# Altium PCB PCB3.PcbDoc
Units mm, origin at the board's own origin, x right, y up, seen from the top; angles counter-clockwise.
Board outline 62.23 x 130.56 mm, 2 copper layers (Top Layer, Bottom Layer); 32 components, 34 nets, 154 pads, 12 vias.
Unrouted connection lines stored in the file: 1.
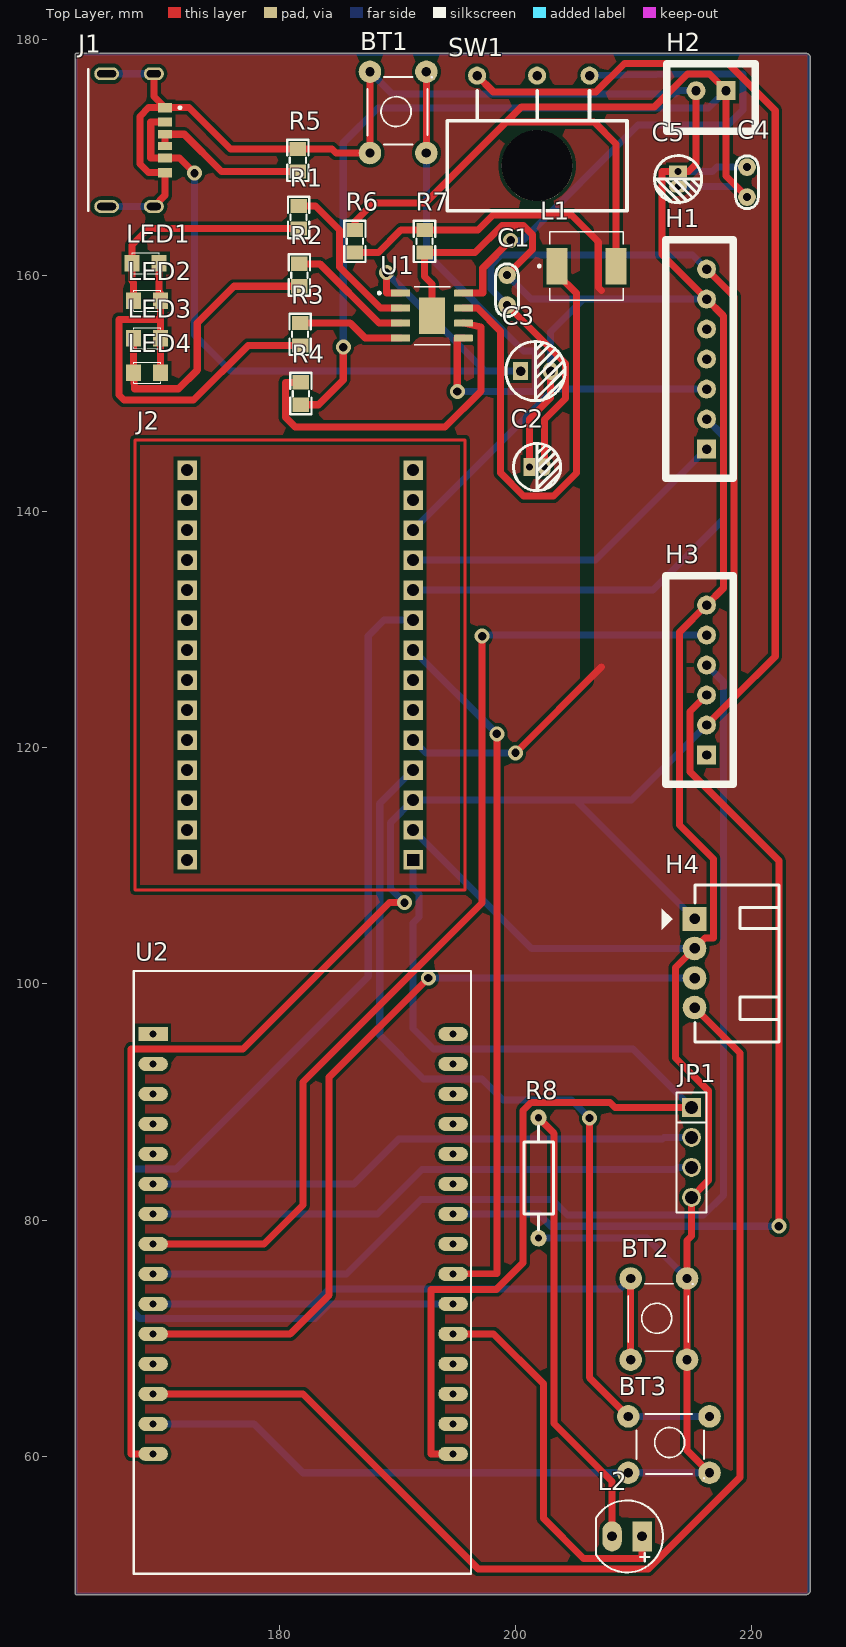
[diagram p0: Top Layer view]
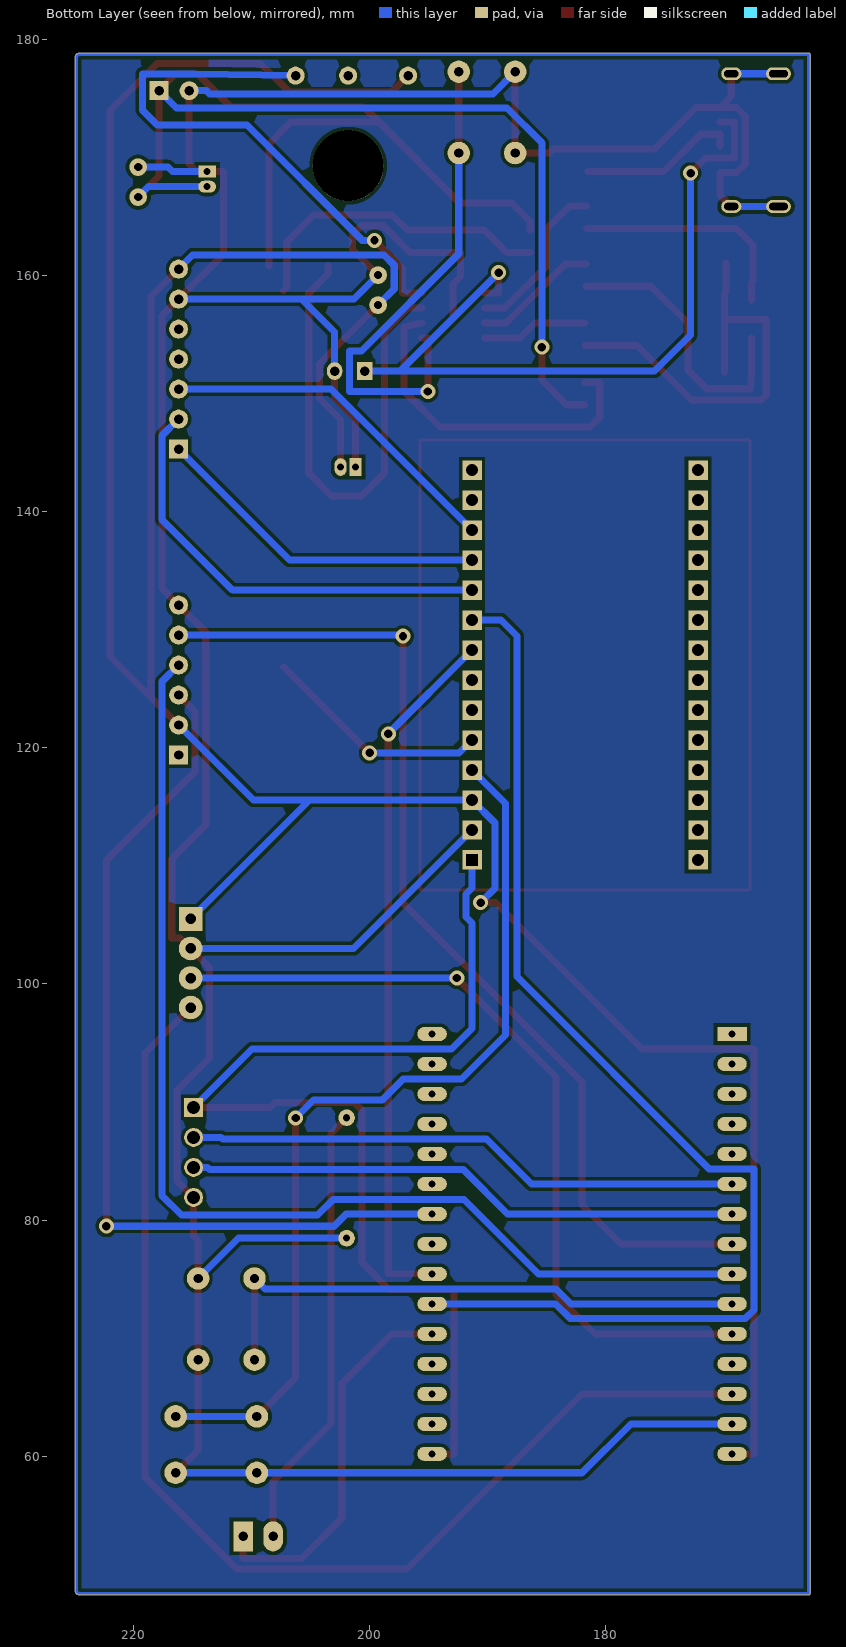
[diagram p1: Bottom Layer view, seen from below]
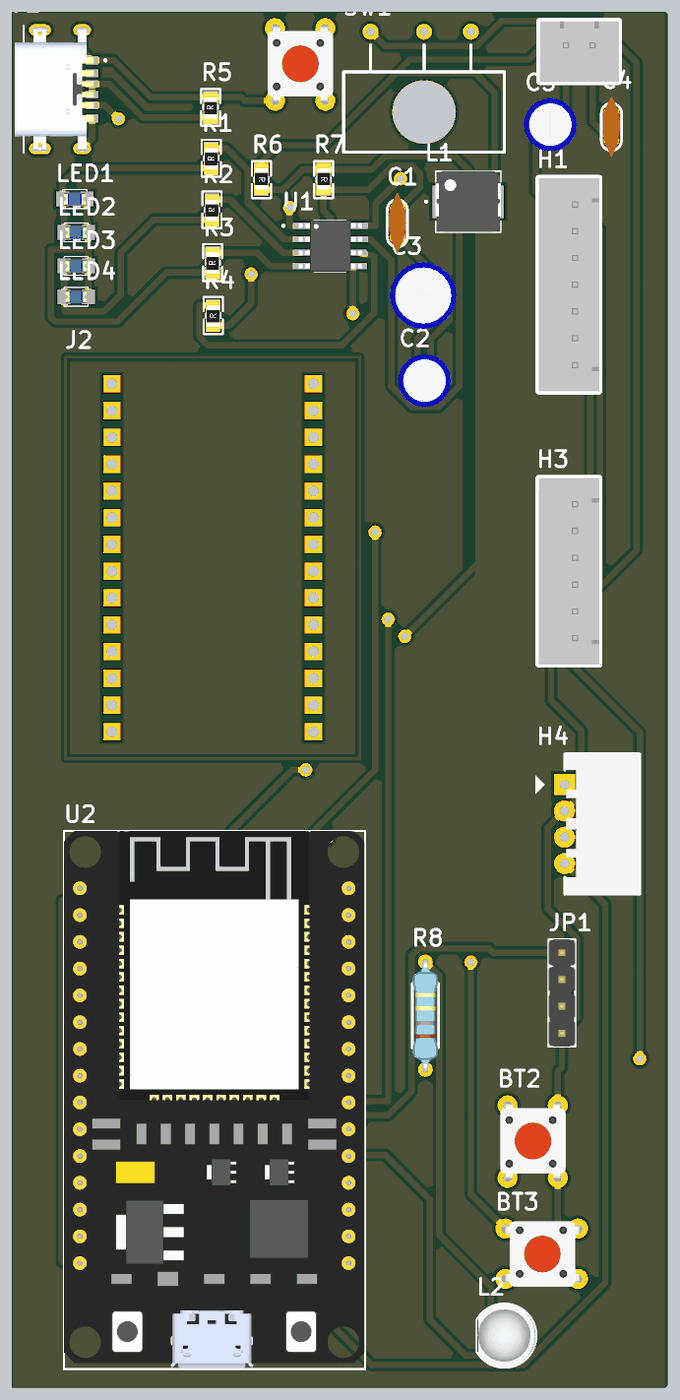
[diagram p2: 3D render of the assembled board from above, using the file's embedded part models]

## Layer stack, top to bottom
Top Solder: solder mask 0.0102, Solder Resist, Dk 3.5
Top Layer: signal copper 0.0356
Dielectric 1: dielectric 0.32, FR-4, Dk 4.8
Bottom Layer: signal copper 0.0356
Bottom Solder: solder mask 0.0102, Solder Resist, Dk 3.5

## Board outline
162.687,48.387 ccw(c162.814,48.387) 162.814,48.26 224.641,48.26 224.731,48.297 224.88,48.446 224.917,48.536 224.917,178.54 224.88,178.63 224.731,178.779 224.641,178.816 162.814,178.816 ccw(c162.814,178.689) 162.687,178.689

## Design rules (kind name [scope] priority, off if disabled: settings)
Clearance [All] p1: gap=0.3 ignorepadtopadclearanceinfootprint=FALSE
PolygonConnect [All] p1: connectstyle=Relief reliefconductorwidth=0.254 reliefentries=4 polygonreliefangle="90 Angle" airgapwidth=0.254
RoutingVias [All] p1: holewidth=0.711 width=1.27 viastyle="Through Hole" minholewidth=0.711 minwidth=1.27 maxholewidth=0.711 maxwidth=1.27
SolderMaskExpansion [All] p1: expansion=0.102 istentingtop=FALSE
SupplyNets "Schematic Supply Nets_2" [InNet('VCC')] p1: voltage=0.000
SupplyNets "Schematic Supply Nets_7" [InNet('BAT_V')] p2: voltage=0.000
SupplyNets "Schematic Supply Nets_6" [InNet('3V3')] p3: voltage=0.000
SupplyNets "Schematic Supply Nets_5" [InNet('VUSB')] p4: voltage=0.000
SupplyNets "Schematic Supply Nets_1" [InNet('GND')] p5: voltage=0.000
Width [All] p1: maxlimit=0.6 minlimit=0.6 preferedwidth=0.6
30 further rules are at their usual default settings.

## Components (designator, comment, footprint, x,y, rotation, side; value= is the part's Value field where it differs from the comment)
BT1 "Button 4P 6x6 DIP" "Nut Nhan 4 Chan Cam 6x6" 187.452,170.688 r90 top
BT2 "SOS" "Nut Nhan 4 Chan Cam 6x6" 209.525,68.504 r90 top
BT3 "SOS" "Nut Nhan 4 Chan Cam 6x6" 209.855,63.576 r0 top
C1 "104" "tu gom" 199.263,158.75 r90 top
C2 "22uF" "tu hoa 4mm" 201.803,143.764 r0 top
C3 "100uF" "tu hoa 5mm" 201.676,151.892 r0 top
C4 "104" "tu gom" 219.583,167.894 r90 top
C5 "22uF" "tu hoa 4mm" 213.741,168.148 r270 top
H1 "DAC MAX98357A" XH2.54M-7 216.16,145.288 r90 top
H2 "Nguồn" XH2.54M-2 217.805,175.641 r180 top
H3 "SIM" XH2.54M-6 216.16,119.38 r90 top
H4 "GPS" "Header 4P DC 2.54" 215.163,105.472 r0 top
J1 "USB4515-GF-A_REVA" GCT_USB4515-GF-A_REVA 165.354,171.45 r270 top
J2 "maixcam" TE_5104338-2 181.737,127 r90 top
JP1 "SR04T" "JP 1x4 DT" 214.884,89.535 r270 top
L1 "150mH" "CUON CAM SMD 0530" 205.994,160.782 r0 top
L2 "LED 5mm" LED-5MM-RED 210.693,53.213 r180 top
LED1 "LED SMD" SM-LED-0805-Blue 167.513,161.036 r0 top
LED2 "LED SMD" SM-LED-0805-Blue 169.926,157.861 r180 top
LED3 "LED SMD" SM-LED-0805-Blue 169.926,154.686 r180 top
LED4 "LED SMD" SM-LED-0805-Blue 167.64,151.765 r0 top
R1 "1K" "tro smd 0805" 181.549,164.903 r90 top value="R1/4W - 1K"
R2 "1K" "tro smd 0805" 181.61,160.02 r90 top value="R1/4W - 1K"
R3 "1K" "tro smd 0805" 181.676,155.002 r90 top value="R1/4W - 1K"
R4 "0R" "tro smd 0805" 181.737,149.987 r90 top value="R1/4W - 1K"
R5 "5K1" "tro smd 0805" 181.483,169.737 r90 top value="R1/4W - 1K"
R6 "100k" "tro smd 0805" 186.436,162.879 r270 top
R7 "100k" "tro smd 0805" 192.339,162.879 r270 top
R8 "330R" "tro vach 1/4w" 201.93,83.566 r270 top
SW1 "SW102B" SW-GAT 196.723,176.911 r0 top value="Switch 102 On Board"
U1 "IP5306" SOP127P600X165-9N 192.913,156.591 r0 top
U2 "ESP32 DEVKIT" "ESP32 WROOM 32 KIT" 169.291,95.758 r0 top

## Footprints (in the part's own frame and the unit in brackets; to place one, negate y for a bottom-side part, rotate by r counter-clockwise, add the part's x,y. Pads: shape width x height; smd on the part's side, far side on the other; paste and mask are expansions set on the pad)
"CUON CAM SMD 0530" [mm] "CUON CAM SMD 0530"
  rect 1.8x3.1 smd: 1(-2.5,0) 2(2.5,0)
  silkscreen extent -4.1,-2.9 3.1,2.9, body extent -3.1,-2.88 3.1,2.92, height 3
"ESP32 WROOM 32 KIT" [mm]
  rect 2.5x1.2 hole 0.6: 1(0,0)
  oval 2.5x1.2 hole 0.6: 2(0,-2.54) 3(0,-5.08) 4(0,-7.62) 5(0,-10.16) 6(0,-12.7) 7(0,-15.24) 8(0,-17.78) 9(0,-20.32) 10(0,-22.86) 11(0,-25.4) 12(0,-27.94) 13(0,-30.48) 14(0,-33.02) 15(0,-35.56) 16(25.4,-35.56) 17(25.4,-33.02) 18(25.4,-30.48) 19(25.4,-27.94) 20(25.4,-25.4) 21(25.4,-22.86) 22(25.4,-20.32) 23(25.4,-17.78) 24(25.4,-15.24) 25(25.4,-12.7) 26(25.4,-10.16) 27(25.4,-7.62) 28(25.4,-5.08) 29(25.4,-2.54) 30(25.4,0)
  silkscreen extent -1.65,-45.72 26.92,5.33, body extent -1.65,-45.6 26.85,5.33, height 10.49
GCT_USB4515-GF-A_REVA [mm]
  rect 0.7x1.2 smd: A5(-0.5,4.95) B5(0.5,4.95)
  rect 0.76x1.2 smd: A9(1.52,4.95) B9(-1.52,4.95)
  rect 0.8x1.2 smd: A12(2.75,4.95) B12(-2.75,4.95)
  oval 1.1x2.1 hole 0.6 slot 1.6 at 90 deg: S1(-5.62,0) S2(5.62,0)
  oval 1.1x1.7 hole 0.6 slot 1.2 at 90 deg: S3(-5.62,4) S4(5.62,4)
  silkscreen extent -6,-1.55 6,6.31, body extent -5.77,-2.4 5.77,5.1, height 1.56
"Header 4P DC 2.54" [mil]
  rect 78.74x78.74 hole 35: 1(-1,1)
  round 78.74 hole 35: 2(-1,-97.43) 3(-1,-195.85) 4(-1,-294.28)
  silkscreen extent -110,-409 280,115, body extent 5,-413 278,123, height 290
"JP 1x4 DT" [mm] "4 pins, 1 row, straight, gold plating"
  rect 1.6x1.6 hole 1.1: 1(0,0)
  round 1.6 hole 1.1: 2(2.54,0) 3(5.08,0) 4(7.62,0)
  silkscreen extent -1.27,-1.27 8.89,1.27, body extent -1.27,-1.27 8.89,1.27, height 8.54
LED-5MM-RED [mil] "LED 2 PIN, 5 ly , Only colour,pin to pin 100mil"
  rect 65x100 hole 32: 1(0,0)
  oval 65x100 hole 32: 2(100,0)
  silkscreen extent -70,-120 154,120, body extent -65,-119 149,118, height 339
"Nut Nhan 4 Chan Cam 6x6" [mil] "SW button 4pin, 250 x250 mil"
  round 75 hole 31: 1(-13,-8) 1(258,-8) 2(-13,-196) 2(258,-196)
  silkscreen extent 15,-215 240,0, body extent -31,-225 281,19, height 276
SM-LED-0805-Blue [mil]
  rect 50x55 smd: 1(0,0) 2(90,0)
  silkscreen extent 0,-35 90,35, body extent 5,-25 85,25, height 43
SOP127P600X165-9N [mm]
  rrect25% 1.61x0.59 smd: 1(-2.655,1.905) 2(-2.655,0.635) 3(-2.655,-0.635) 4(-2.655,-1.905) 5(2.655,-1.905) 6(2.655,-0.635) 7(2.655,0.635) 8(2.655,1.905)
  rect 2.21x3.1 smd paste-3: 9(0,0)
  silkscreen extent -4.56,-2.45 1.53,2.45, body extent -3,-2.45 3,2.45, height 1.65
SW-GAT [mm]
  round 6 hole 6: 0(5.08,-7.62)
  round 1.524 hole 0.8: 1(0,0) 2(5.08,0) 3(9.525,0)
  silkscreen extent -2.54,-11.43 12.7,-1.27
TE_5104338-2 [mm]
  rect 1.651x1.651 hole 1 square: 1(-16.51,-9.57)
  rect 1.651x1.651 hole 1: 2(-13.97,-9.57) 3(-11.43,-9.57) 4(-8.89,-9.57) 5(-6.35,-9.57) 6(-3.81,-9.57) 7(-1.27,-9.57) 8(1.27,-9.57) 9(3.81,-9.57) 10(6.35,-9.57) 11(8.89,-9.57) 12(11.43,-9.57) 13(13.97,-9.57) 14(16.51,-9.57) 15(16.51,9.57) 16(13.97,9.57) 17(11.43,9.57) 18(8.89,9.57) 19(6.35,9.57) 20(3.81,9.57) 21(1.27,9.57) 22(-1.27,9.57) 23(-3.81,9.57) 24(-6.35,9.57) 25(-8.89,9.57) 26(-11.43,9.57) 27(-13.97,9.57) 28(-16.51,9.57)
  Top Layer lines w0.254: -19.05,13.97 19.05,13.97 19.05,-13.97 -19.05,-13.97 -19.05,13.97
"tro smd 0805" [mm]
  rect 1.2x1.4 smd: 1(-0.946,-0.061) 2(0.954,-0.061)
  silkscreen extent -1.75,-0.97 1.75,0.84, body extent -1.56,-0.76 1.44,0.64, height 0.53
"tro vach 1/4w" [mm]
  round 1.4 hole 0.6: 1(-5.1,0) 2(5.1,0)
  silkscreen extent -4.39,-1.25 4.42,1.25, body extent -5.38,-1.2 5.38,1.2, height 2.41
"tu gom" [mm] "Tu gom mini"
  round 1.5 hole 0.7: 1(-1.27,0) 2(1.27,0)
  silkscreen extent -2.25,-0.97 2.22,0.97, body extent -2.92,-0.85 2.92,0.85, height 6.12
"tu hoa 4mm" [mm]
  rect 1x1.5 hole 0.6: 1(-0.635,0)
  oval 1x1.5 hole 0.6: 2(0.635,0)
  silkscreen extent -2,-2 2.01,2.01, body extent -2.47,-2.47 2.58,2.58, height 14.81
"tu hoa 5mm" [mm]
  rect 1.3x1.5 hole 0.8: 1(-1.27,0)
  oval 1.3x1.5 hole 0.8: 2(1.27,0)
  silkscreen extent -2.51,-2.51 2.51,2.51, body extent -3.12,-3.18 3.23,3.18, height 14.55
XH2.54M-2 [mm]
  rect 1.6x1.6 hole 0.8: 1(0,0)
  round 1.6 hole 0.8: 2(2.54,0)
  silkscreen extent -2.48,-2.26 5.02,3.46, body extent -2.48,-2.26 5.02,3.48, height 6.91
XH2.54M-6 [mm]
  rect 1.6x1.6 hole 0.8: 1(0,0)
  round 1.6 hole 0.8: 2(2.54,0) 3(5.08,0) 4(7.62,0) 5(10.16,0) 6(12.7,0)
  silkscreen extent -2.48,-2.26 15.18,3.46, body extent -2.48,-2.26 15.18,3.48, height 6.91
XH2.54M-7 [mm]
  rect 1.6x1.6 hole 0.8: 1(0,0)
  round 1.6 hole 0.8: 2(2.54,0) 3(5.08,0) 4(7.62,0) 5(10.16,0) 6(12.7,0) 7(15.24,0)
  silkscreen extent -2.48,-2.26 17.72,3.46, body extent -2.48,-2.26 17.72,3.48, height 6.91

## Part data
BT1: "Button 4pin 6x6 DIP", Ma_Hang=MH004584, Ten="Nút Nhấn 4 Chân 6x6x5MM DIP"
BT2 BT3: library part "Nut Nhan 4 Chan Cam 6x6", "Nut Nhan 4 Chan 6x6mm", Ma_Hang=MH004584, Ten="Nút Nh?n 4 Chân 6x6x5MM DIP"
C1: library part "Tu gom 104 50V", "C?m", Chung_Loai=C?m, Don_Vi=Con, Ma_Hang=MH004761, So_Chan=2, Ten_Linh_Kien="T? g?m 104 100nF 50V"
C2: library part "Tu Hoa 22uF 16V 4x7", "C?m", Chung_Loai=C?m, Don_Vi=Con, Ma_Hang=MH006857, So_Chan=2, Ten_Linh_Kien="T? Hóa 22uF 16V"
C3: library part "Tu Hoa 100uF 16V 5x11", "Cắm", Chung_Loai=Cắm, Don_Vi=Con, Ma_Hang=MH008417, So_Chan=2, Ten_Linh_Kien="Tụ Hóa 100uF 16V 5x11MM"
C4: library part "Tu gom 104 50V", "Cắm", Chung_Loai=Cắm, Don_Vi=Con, Ma_Hang=MH004761, So_Chan=2, Ten_Linh_Kien="Tụ gốm 104 100nF 50V"
C5: library part "Tu Hoa 22uF 16V 4x7", "Cắm", Chung_Loai=Cắm, Don_Vi=Con, Ma_Hang=MH006857, So_Chan=2, Ten_Linh_Kien="Tụ Hóa 22uF 16V"
H1: library part "Header 7P 2.54 Duc Thang", "C?m", Chung_Loai=C?m, Don_Vi=Con, Ma_Hang=MH003369, Ten_Linh_Kien="Header 7P XH2.54-7P Ð?c Th?ng"
H2: library part "Header 2P 2.54 Duc Thang", "C?m", Chung_Loai=C?m, Don_Vi=Con, Ma_Hang=MH001283, Ten_Linh_Kien="Header 2P XH2.54-2P Ð?c Th?ng"
H3: library part "Header 6P 2.54 Duc Thang", "C?m", Chung_Loai=C?m, Don_Vi=Con, Ma_Hang=MH001972, Ten_Linh_Kien="Header 6P XH2.54-6P Ð?c Th?ng"
H4: library part "Header 4P 2.54 Duc Cong", "C?m", Chung_Loai=C?m, Don_Vi=Con, Ma_Hang=MH001310, Ten_Linh_Kien="Header 4P XH2.54-4P Ð?c Cong"
J1: "Type C USB Charging Connector", Package=None, Check_prices=https://www.snapeda.com/parts/USB4515-GF-A/Global+Connector+Technology/view-part/?ref=eda, Digi-Key_Part_Number=2073-USB4515-GF-ATR-ND, MF="Global Connector Technology", MP=USB4515-GF-A, SnapEDA_Link=https://www.snapeda.com/parts/USB4515-GF-A/Global+Connector+Technology/view-part/?ref=snap
J2: library part 5104338-2, "HEADER, PIN, AMP-LATCH, 14 POS, 2.54 X 2.54, VERTICAL, LOW PROFILE, PCB", Package=None, Check_prices=https://www.snapeda.com/parts/5104338-2/TE+Connectivity+AMP+Connectors/view-part/?ref=eda, EU_RoHS_Compliance=Compliant, MF="TE Connectivity", MP=5104338-2, SnapEDA_Link=https://www.snapeda.com/parts/5104338-2/TE+Connectivity+AMP+Connectors/view-part/?ref=snap
JP1: library part "JP 1x4 2.54 Duc Thang", "C?m", Chung_Loai=C?m, Don_Vi=Con, Ma_Hang=MH000903, Ten_Linh_Kien="Jump Ðon Ð?c 2.54MM 1x40P Th?ng 11MM"
L1: library part "Cuon Cam SMD 0530", "SMD 0530", Package=None, Availability=Unavailable, MP=FDV0530-H-1R5M=P3, Price=None
L2: library part "LED 5mm Do", "C?m", Chung_Loai=C?m, Don_Vi=Con, Ma_Hang=MH008967, Ten_Linh_Kien="Led 5MM Ph? Ð? (1000c)"
LED1 LED2 LED3 LED4: library part LED-SMD-0805
R1 R2 R3 R4 R5: library part R1/4W, "Resistor 1/4W"
R6 R7: library part "Tro 0805 5% 100k", "Dán", Chung_Loai=Dán, Don_Vi=Con, Ma_Hang=MH005250, So_Chan=2, Ten_Linh_Kien="Tr? 0805 5% 100k"
R8: library part "Tro Vach 1/4W 5% 330R", "C?m", Chung_Loai=C?m, Don_Vi=Con, Ma_Hang=MH007436, So_Chan=2, Ten_Linh_Kien="Tr? V?ch 1/4W 5% 330R"
SW1: "Switch 102 on Broad"
U1: "Fully-Integrated Power Bank System-On-Chip with 2.1A charger, 2.4A discharger", Package="SOIC-4 INJOINIC", Check_prices=https://www.snapeda.com/parts/IP5306/Injoinic/view-part/?ref=eda, MF=Injoinic, MP=IP5306, SnapEDA_Link=https://www.snapeda.com/parts/IP5306/Injoinic/view-part/?ref=snap
U2: library part "ESP32 WROOM 32 KIT"

## Via types
v1: diameter 1.27, hole 0.711, Top Layer to Bottom Layer, 12 vias

## Nets (pads, with @x,y where several pads share a name; then routed paths per layer and width w, separated by ;. In a path a pad name is that pad's centre, name@x,y a point inside that pad or via, vN(x,y) a via of type N, cw(c..) or ccw(c..) an arc to the next point about the centre after c; other vN are vias at no path point)
3V3: J2.1 JP1.1 U2.16 | length 93.2
  Top Layer w0.6: U2.16 192.837,60.198 192.837,74.117 198.348,74.117 200.609,76.379 200.609,89.281 201.295,89.967 207.975,89.967 208.407,89.535 JP1.1
  Bottom Layer w0.6: J2.1 191.307,108.118 191.811,107.614 191.811,105.648 191.307,105.144 191.307,96.221 193.04,94.488 209.931,94.488 JP1.1
BAT_ADC: J2.5 R6.2 R7.1 | length 46.5
  Top Layer w0.6: R6.2 188.366,161.925 190.266,163.825 R7.1 196.799,163.825 198.076,165.101 204.718,165.101 206.994,162.825 206.994,158.983 207.264,158.713 ; v1(199.974,119.558) 207.264,126.848
  Bottom Layer w0.6: J2.5 192.399,119.558 v1(199.974,119.558)
BAT_V: C4.1 C5.2 H2.1 L1.2 R4.1 R6.1 | length 133.1
  Top Layer w0.6: R4.1 183.306,149.041 185.395,151.13 v1(185.395,153.924) ; R6.1 186.375,164.557 187.96,166.141 192.354,166.141 199.212,172.999 ; L1.2 208.494,171.134 206.629,172.999 199.212,172.999 ; C4.1 217.805,168.402 H2.1 216.405,177.041 214.531,177.041 211.76,174.269 200.482,174.269 199.212,172.999
  Bottom Layer w0.6: v1(185.395,153.924) 185.395,171.221 188.341,174.168 216.332,174.168 H2.1 ; C5.2 218.694,167.513 C4.1
BTN_3: U2.19
BTN_SCAN: BT3.1 J2.4 | length 77.8
  Top Layer w0.6: v1(206.248,88.646) 206.248,66.65 BT3.1@209.525,63.373
  Bottom Layer w0.6: J2.4 188.479,115.282 188.479,95.671 192.202,91.948 197.129,91.948 198.907,90.17 204.724,90.17 v1(206.248,88.646) ; BT3.1@209.525,63.373 BT3.1@216.408,63.373
BTN_SOS: BT2.1 U2.10 | length 48.2
  Top Layer w0.6: BT2.1@209.728,68.174 BT2.1@209.728,75.057
  Bottom Layer w0.6: U2.10 182.931,72.898 184.201,74.168 208.839,74.168 BT2.1@209.728,75.057
GND: BT1.1 BT2.2 BT3.2 C1.2 C2.1 C3.2 C4.2 C5.1 H1.6 H2.2 H3.6 H4.2 J1.A12 J1.B12 J1.S1 J1.S2 J1.S3 J1.S4 J2.2 JP1.4 R5.2 R7.2 R8.2 U1.9 U2.14 | length 357.6
  Top Layer w0.6: J1.S4 170.304,166.78 J1.A12 168.91,168.7 168.173,169.437 168.173,173.463 168.91,174.2 J1.B12 ; J1.S3 169.354,175.15 J1.B12 ; BT1.1@187.655,177.241 187.655,170.358 184.763,170.358 184.429,170.692 R5.2 175.847,170.692 172.339,174.2 J1.B12 ; U1.9 192.913,159.258 192.278,159.893 R7.2 196.547,161.925 198.823,164.201 200.66,164.201 201.422,163.439 201.422,162.179 C1.2 ; C2.1 201.168,147.828 202.946,149.606 C3.2 ; H2.2 215.265,169.418 214.63,168.783 C5.1 212.369,168.783 212.369,161.778 H1.6 217.576,156.571 217.576,133.497 H3.6 213.86,129.78 213.86,113.445 216.738,110.566 216.738,103.886 216.027,103.886 H4.2 213.538,101.397 213.538,93.726 216.306,90.957 216.306,83.337 JP1.4 214.884,78.664 214.503,78.283 214.503,75.057 214.503,68.174 214.503,60.503 BT3.2@216.408,58.598
  Bottom Layer w0.6: J1.S2 J1.S4 ; J1.S1 J1.S3 ; U2.14 177.851,62.738 181.991,58.598 209.525,58.598 BT3.2@216.408,58.598 ; BT1.1@187.655,177.241 189.535,175.362 213.538,175.362 213.817,175.641 H2.2 ; J2.2 201.34,102.997 H4.2 ; C1.2 201.295,157.988 205.74,157.988 ; R8.2 211.094,78.466 BT2.2@214.503,75.057 ; C3.2 202.946,155.194 205.74,157.988 ; C5.1 216.662,168.783 217.043,169.164 C4.2 ; H1.6 205.74,157.988
GPS_RX: H4.4 U2.13 | length 100.5
  Top Layer w0.6: U2.13 181.991,65.278 196.826,50.443 211.225,50.443 218.999,58.217 218.999,94.136 H4.4
GPS_TX: H4.3 U2.11 | length 69.1
  Top Layer w0.6: U2.11 180.899,70.358 184.201,73.66 184.201,92.1 v1(192.597,100.497)
  Bottom Layer w0.6: v1(192.597,100.497) H4.3
I2S_BCLK: H1.2 J2.10 | length 37.8
  Bottom Layer w0.6: J2.10 211.607,133.35 217.576,139.319 217.576,146.411 H1.2
I2S_DIN: H1.3 J2.12 | length 29.8
  Bottom Layer w0.6: J2.12 203.245,150.368 H1.3
I2S_LRCLK: H1.1 J2.11 | length 28.7
  Bottom Layer w0.6: J2.11 206.762,135.89 H1.1
LED_SOS: L2.1 U2.20 | length 32.4
  Top Layer w0.6: U2.20 198.12,70.358 202.336,66.142 202.336,54.747 205.74,51.343 210.693,51.343 L2.1
LINK_RX: J2.8 U2.22 | length 59.5
  Top Layer w0.6: U2.22 198.399,75.463 v1(198.399,121.178)
  Bottom Layer w0.6: J2.8 v1(198.399,121.178)
LINK_TX: J2.9 U2.21 | length 100
  Bottom Layer w0.6: J2.9 188.849,130.81 187.506,129.467 187.506,100.611 171.223,84.328 167.437,84.328 167.437,72.39 168.148,71.679 183.007,71.679 184.226,72.898 U2.21
NetBT1_2: BT1.2 U1.5 | length 43.2
  Top Layer w0.6: BT1.2@192.43,170.358 BT1.2@192.43,177.241 ; v1(195.047,150.165) 195.047,154.686 U1.5
  Bottom Layer w0.6: BT1.2@192.43,170.358 192.43,161.823 200.66,153.594 201.676,153.594 201.676,150.165 v1(195.047,150.165)
NetJ1_A5: J1.A5 J1.B5 R5.1 | length 13.5
  Top Layer w0.6: J1.B5 J1.A5 171.933,171.95 175.091,168.792 R5.1
NetL1_1: L1.1 U1.7 | length 42.2
  Top Layer w0.6: U1.7 196.748,157.226 198.704,155.27 198.704,143.281 200.66,141.326 203.2,141.326 205.13,143.256 205.13,158.485 203.494,160.122 L1.1
NetL2_2: L2.2 R8.1 | length 38
  Top Layer w0.6: R8.1 203.251,87.345 203.251,62.763 208.153,57.861 L2.2
NetLED1_1: LED1.1 LED2.2 R1.1 | length 19.4
  Top Layer w0.6: LED2.2 167.64,159.385 167.513,159.512 LED1.1 167.513,162.56 168.91,163.957 R1.1
NetLED1_2: LED1.2 LED2.1 LED3.1 LED4.2 R3.1 | length 36.7
  Top Layer w0.6: LED1.2 169.799,158.633 169.926,158.506 LED2.1 169.926,156.261 ; LED4.2 LED3.1 169.926,156.261 ; R3.1 177.348,154.056 172.72,149.428 166.827,149.428 166.395,149.86 166.395,156.261 169.926,156.261
NetLED3_2: LED3.2 LED4.1 R2.1 | length 24.2
  Top Layer w0.6: LED3.2 LED4.1 167.716,150.393 171.45,150.393 173.025,151.968 173.025,155.95 176.149,159.074 R2.1
NetR1_2: R1.2 U1.2 | length 14.1
  Top Layer w0.6: R1.2 183.037,165.857 185.064,163.83 185.064,160.706 188.544,157.226 U1.2
NetR2_2: R2.2 U1.3 | length 10.7
  Top Layer w0.6: R2.2 183.399,160.974 188.417,155.956 U1.3
NetR3_2: R3.2 U1.4 | length 9
  Top Layer w0.6: R3.2 185.979,155.956 187.249,154.686 U1.4
NetR4_2: R4.2 U1.6 | length 29.4
  Top Layer w0.6: R4.2 180.492,150.941 180.492,147.98 181.331,147.142 194.005,147.142 197.053,150.19 197.053,155.626 U1.6
NetSW1_3: SW1.3 U1.8 | length 47.4
  Top Layer w0.6: U1.8 197.206,158.496 197.206,160.604 v1(199.568,162.966)
  Bottom Layer w0.6: v1(199.568,162.966) 200.609,162.966 210.363,172.72 217.957,172.72 219.227,173.99 219.227,177.063 214.808,177.063 SW1.3
RST_SIM: H3.3 U2.24 | length 76.7
  Top Layer w0.6: H3.3 214.76,123.06 214.76,117.958 222.275,110.442 v1(222.275,79.477)
  Bottom Layer w0.6: U2.24 201.955,80.518 202.997,79.477 v1(222.275,79.477)
RX_SIM: H3.4 U2.9 | length 97.6
  Bottom Layer w0.6: U2.9 185.674,75.438 191.973,81.737 203.059,81.737 204.38,80.416 215.9,80.416 217.576,82.093 217.576,125.583 H3.4
SR04_ECHO: JP1.3 U2.7 | length 47.2
  Bottom Layer w0.6: U2.7 188.29,80.518 192.049,84.277 213.538,84.277 213.716,84.455 JP1.3
SR04_TRIG: JP1.2 U2.6 | length 47.2
  Bottom Layer w0.6: U2.6 186.284,83.058 190.094,86.868 212.42,86.868 212.547,86.995 JP1.2
TX_SIM: H3.5 U2.8 | length 87.6
  Top Layer w0.6: U2.8 178.689,77.978 181.991,81.28 181.991,91.694 197.155,106.858 v1(197.155,129.438)
  Bottom Layer w0.6: v1(197.155,129.438) 197.256,129.54 H3.5
VCC: C1.1 C2.2 H1.7 H3.2 H4.1 J2.3 SW1.1 U2.15 | length 275.8
  Top Layer w0.6: U2.15 167.437,60.198 167.437,94.488 176.911,94.488 189.306,106.883 v1(190.576,106.883) ; SW1.1 198.095,175.539 206.807,175.539 209.208,177.941 217.994,177.941 221.971,173.965 221.971,127.731 218.491,124.251 ; C1.1 204.216,152.527 204.216,149.581 202.438,147.803 C2.2 ; H3.2 218.491,124.251 ; H1.7 218.491,158.197 218.491,124.251
  Bottom Layer w0.6: v1(190.576,106.883) 189.379,108.08 189.379,113.642 J2.3 205.065,115.57 ; C1.1 197.891,158.852 197.891,160.858 198.755,161.722 214.966,161.722 H1.7 ; H4.1 205.065,115.57 ; H3.2 209.81,115.57 205.065,115.57
VUSB: C3.1 J1.A9 J1.B9 U1.1 | length 65.8
  Top Layer w0.6: J1.B9 169.088,172.97 169.088,169.93 J1.A9 171.526,169.93 v1(172.796,168.66) ; v1(189.052,160.223) 189.052,158.496 U1.1
  Bottom Layer w0.6: v1(172.796,168.66) 172.796,154.94 175.844,151.892 197.383,151.892 ; v1(189.052,160.223) 197.383,151.892 ; C3.1 197.383,151.892
pads on no net: H1.4 H1.5 H3.1 J2.6 J2.7 J2.13 J2.14 J2.15 J2.16 J2.17 J2.18 J2.19 J2.20 J2.21 J2.22 J2.23 J2.24 J2.25 J2.26 J2.27 J2.28 SW1.0 SW1.2 U2.1 U2.2 U2.3 U2.4 U2.5 U2.12 U2.17 U2.18 U2.23 U2.25 U2.26 U2.27 U2.28 U2.29 U2.30
copper on no net: | length 384.4
  Bottom Layer w0.254: 162.814,48.387 224.641,48.387 224.79,48.536 224.79,178.54 224.641,178.689 162.814,178.689 162.814,48.387

## Polygon pours and split planes (outlines as drawn)
no net on Bottom Layer "NONET_L02_P000" (solid, pour order 0): 162.814,178.689 162.888,178.615 224.716,178.615 224.716,48.461 224.641,48.387 162.814,48.387
no net on Top Layer "NONET_L01_P001" (solid, pour order 1): 162.814,178.689 224.663,178.689 224.663,48.387 162.814,48.387

## Text inside footprints (layer, text, board x,y; h text height)
J1: Mechanical 13 "PCB EDGE" at 163.954,164.81 h0.41 r270